# Altium PCB 8_1000M_Switch_VT1.1.PcbDoc (part 1 of 3)
Units mil, origin at the board's own origin, x right, y up, seen from the top; angles counter-clockwise.
Board outline 6257.04 x 4516.14 mil, 2 copper layers (Top Layer, Bottom Layer); 180 components, 239 nets, 766 pads, 500 vias.
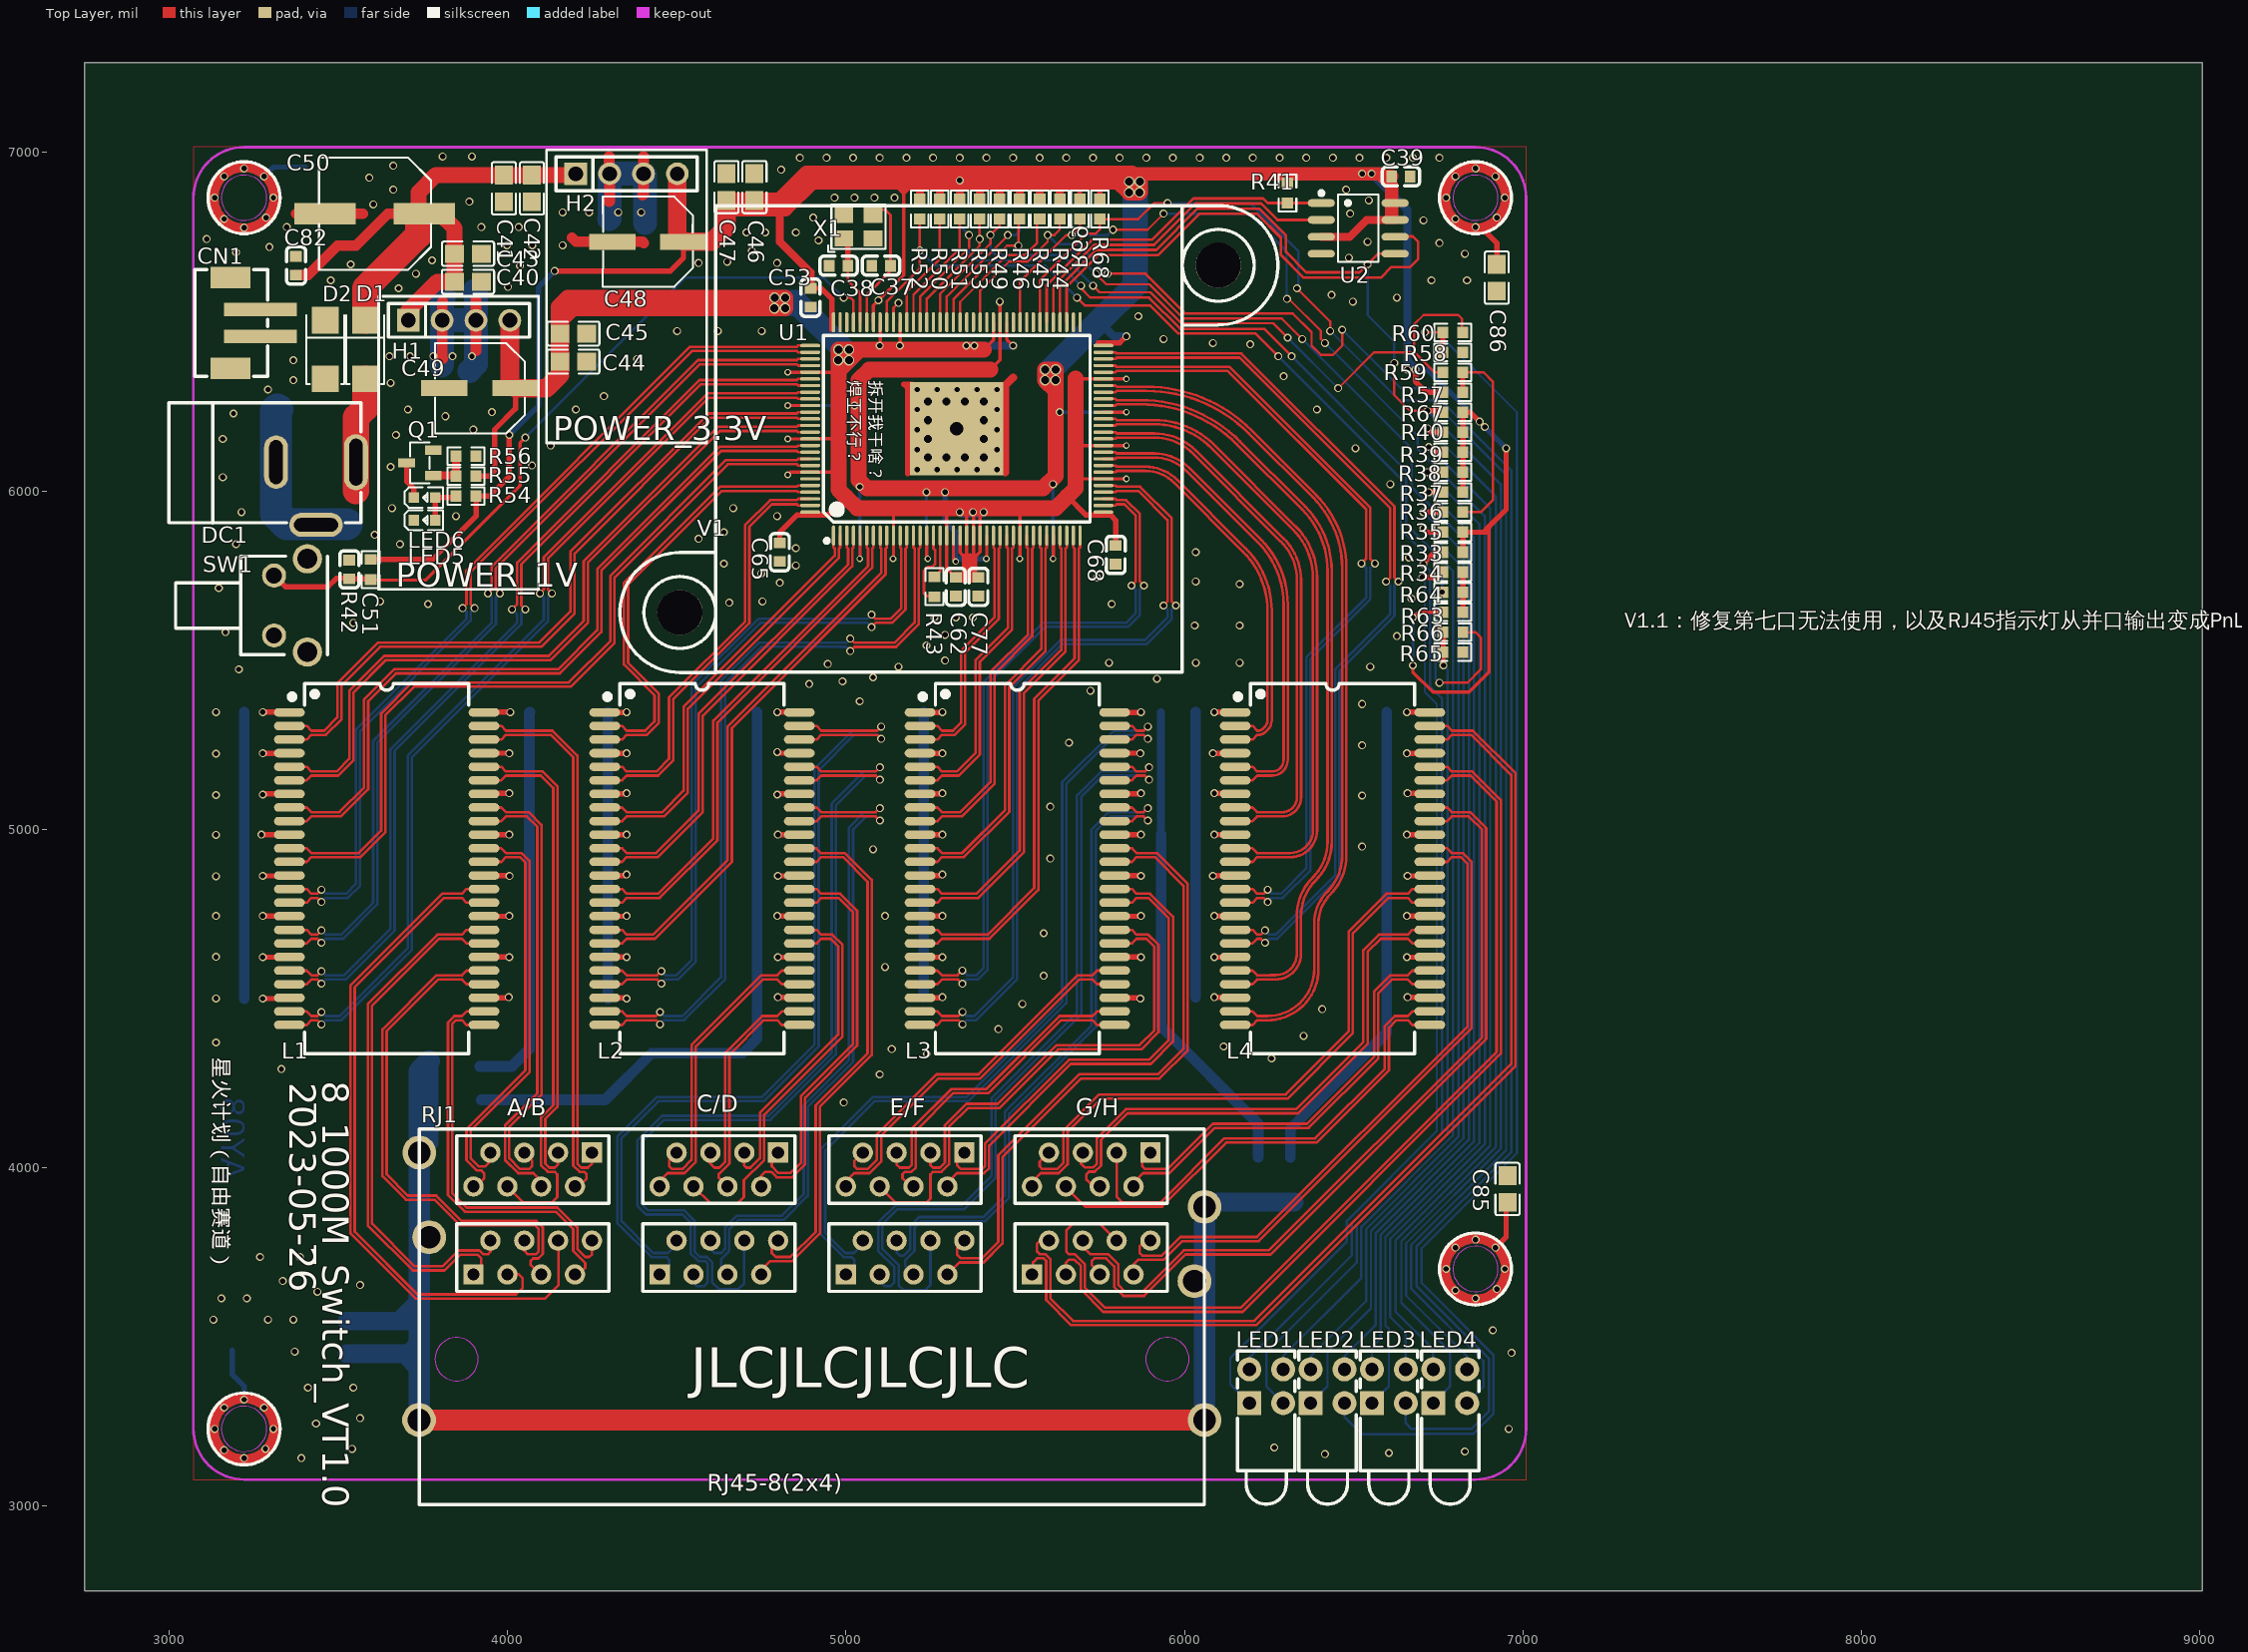
[diagram p0: Top Layer view]
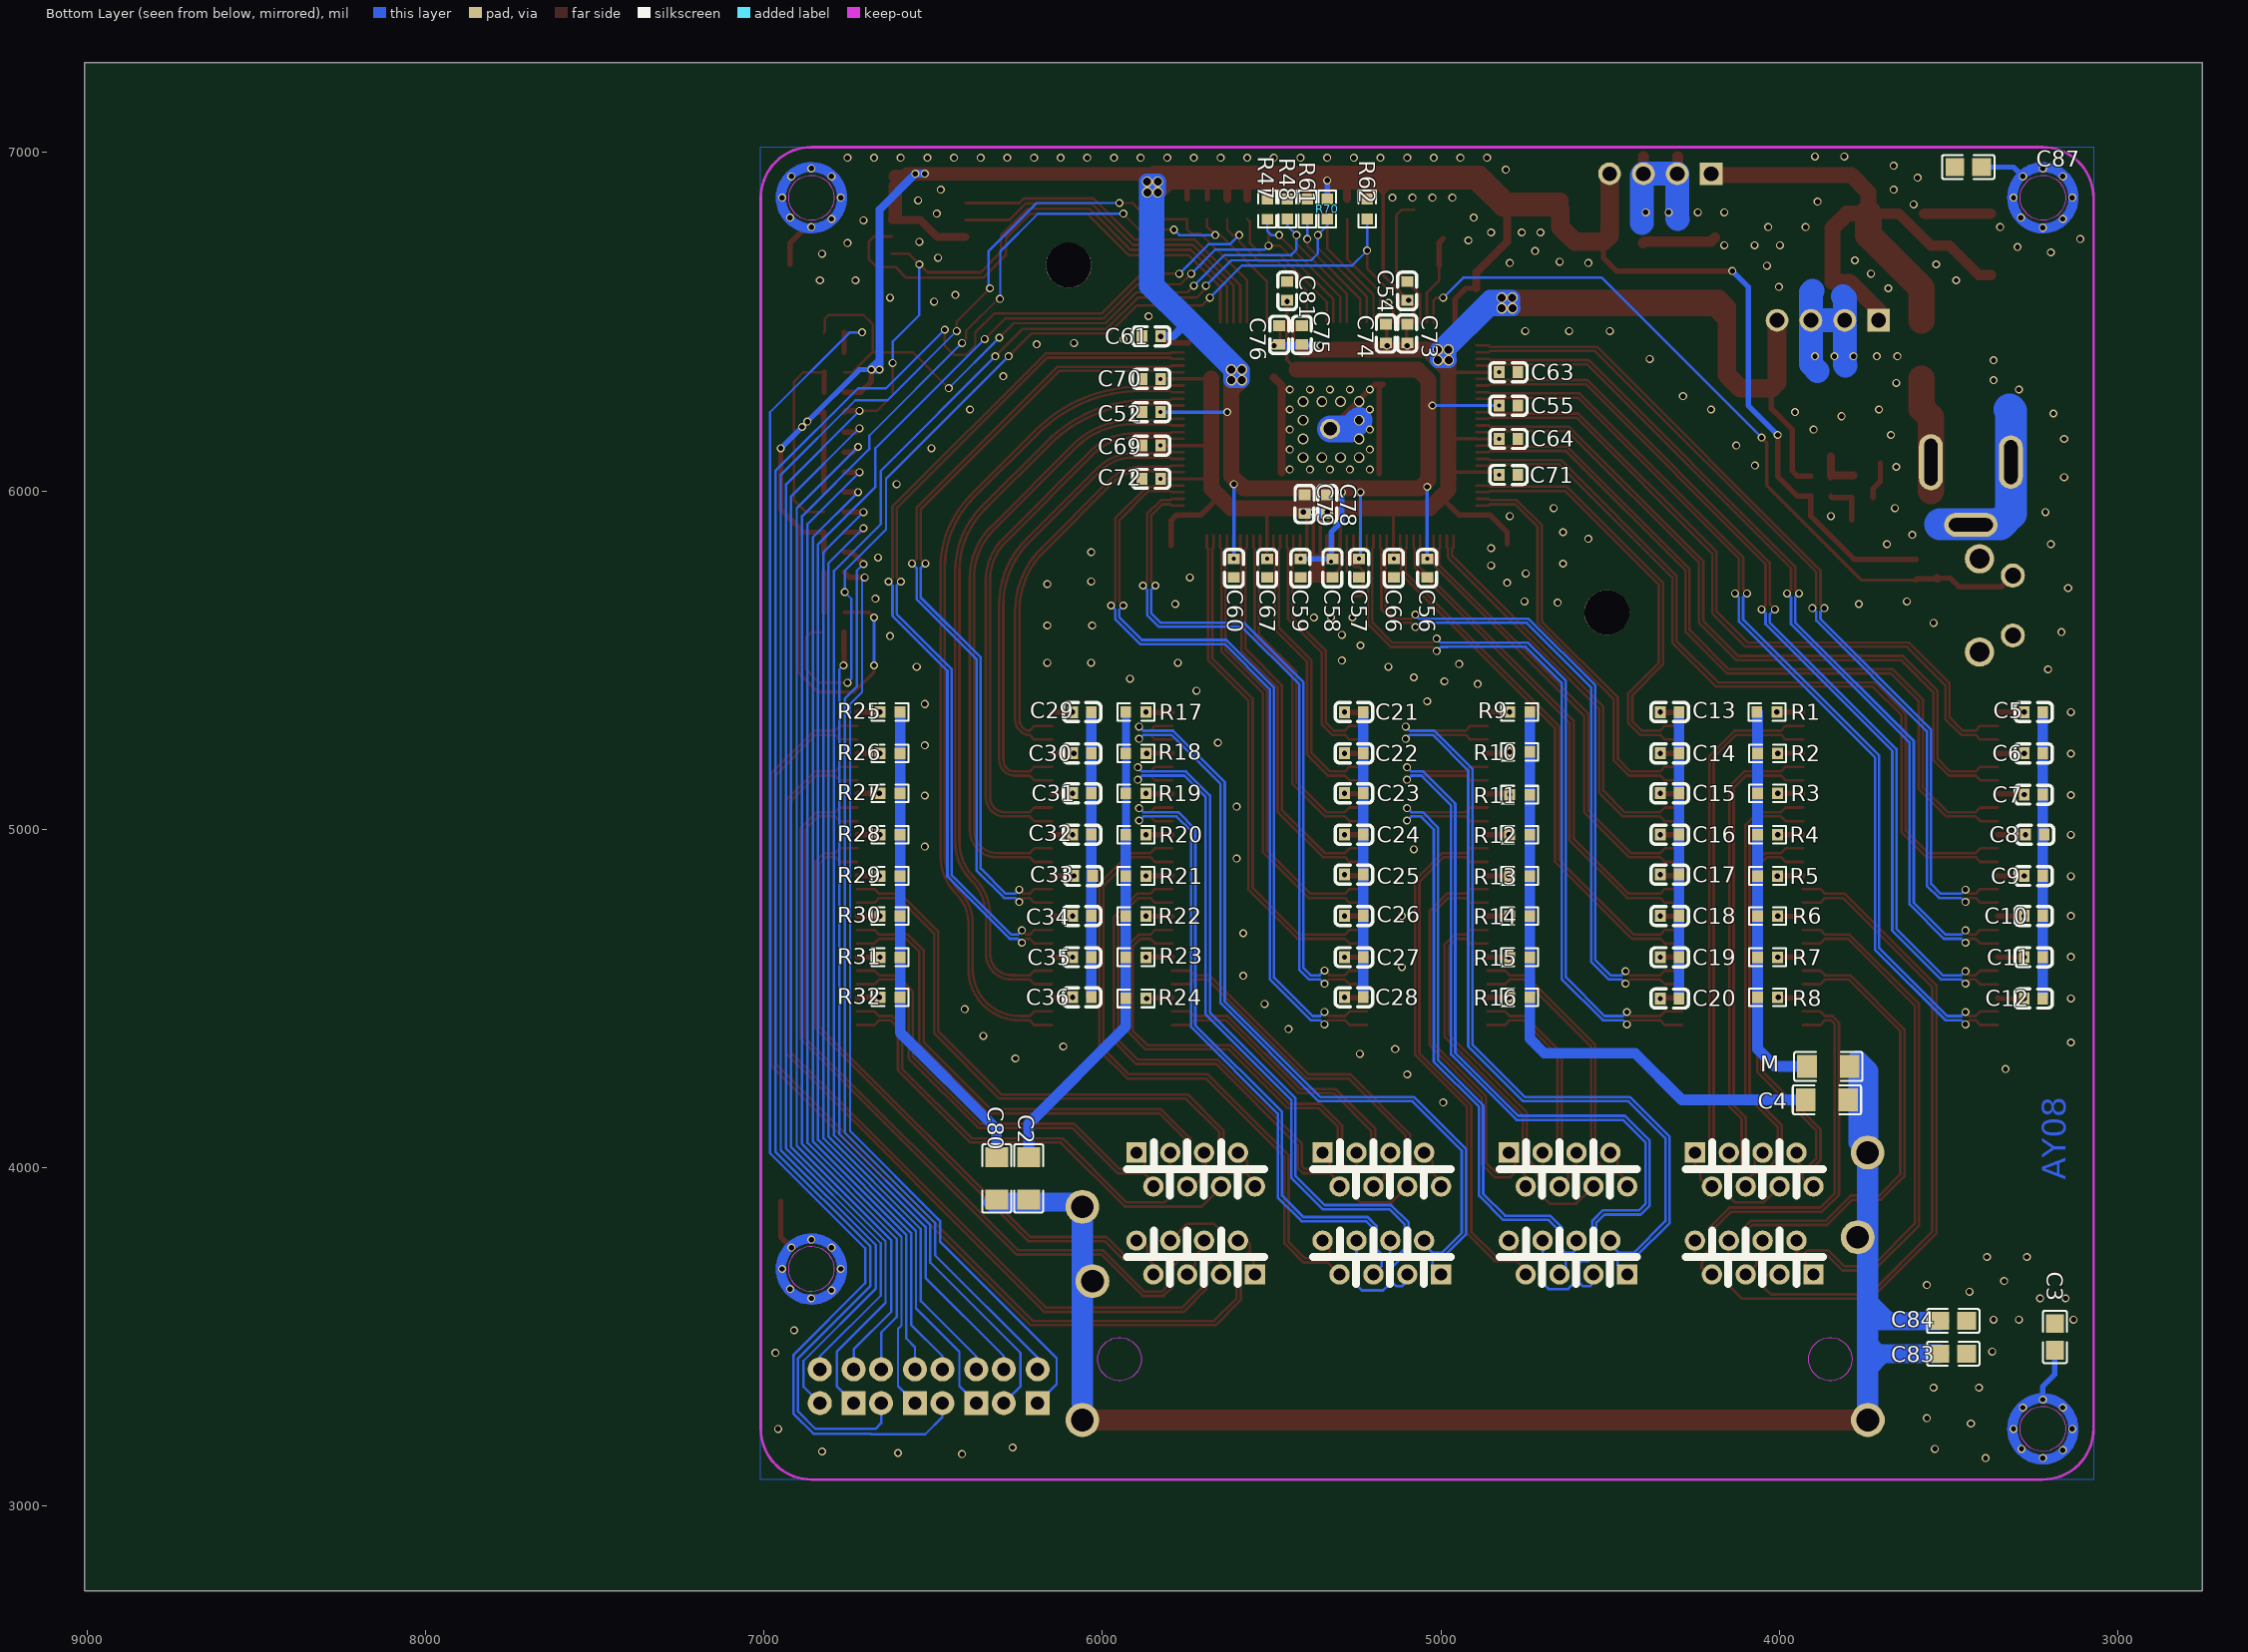
[diagram p1: Bottom Layer view, seen from below]

## Layer stack, top to bottom
Top Solder Mask Layer: solder mask 0.4, Solder Resist, Dk 3.5
Top Layer: signal copper 1.4
Dielectric1: dielectric 12.6, FR-4, Dk 4.8
Bottom Layer: signal copper 1.4
Bottom Solder Mask Layer: solder mask 0.4, Solder Resist, Dk 3.5

## Board outline
9007.04,2750 2750,2750 2750,7266.14 9007.04,7266.14

## Design rules (kind name [scope] priority, off if disabled: settings)
AssemblyTestPointUsage [All] p0: scope1count=1 scope1_0_kind=Board scope1_0_value=Board scope2count=1 scope2_0_kind=Board scope2_0_value=Board commentlength=0
AssemblyTestpoint [All] p0: scope1count=1 scope1_0_kind=Board scope1_0_value=Board scope2count=1 scope2_0_kind=Board scope2_0_value=Board commentlength=0
BoardOutlineClearance safeClearance_1 [All] p0: scope1count=1 scope1_0_kind=Board scope1_0_value=Board scope2count=1 scope2_0_kind=Board scope2_0_value=Board commentlength=0 gap=10
BoardOutlineClearance safeClearance_1 [All] p1: gap=10 ignorepadtopadclearanceinfootprint=FALSE except(0: Arc-SplitContinuation Track-SplitContinuation SMDPad-SplitContinuation THPad-SplitContinuation Via-SplitContinuation Fill-SplitContinuation Poly-SplitContinuation Region-SplitContinuation Text-SplitContinuation; 7.1: Track-OutlineEdge Track-CutoutEdge SMDPad-OutlineEdge SMDPad-CutoutEdge THPad-OutlineEdge THPad-CutoutEdge Via-OutlineEdge Via-CutoutEdge Fill-OutlineEdge Fill-CutoutEdge Poly-OutlineEdge Region-OutlineEdge Region-CutoutEdge Text-OutlineEdge)
Clearance safeClearance [All] p0 off: scope1count=1 scope1_0_kind=Board scope1_0_value=Board scope2count=1 scope2_0_kind=Board scope2_0_value=Board commentlength=4614 gap=7.1 // Protel DXP Scope 1 Expression Was: (InNet('CGND') OR InNet('P4D_P') OR InNet('P4C_N') OR InNet('P4C_P') OR InNet('P4B_N') OR InNet('P4B_P') OR InNet('P4A_N') OR InNet('P4A_P') OR InNet('P3D_N') OR InNet('P3D_P') OR InNet('P3C_N') OR InNet('P3C_P') OR InNet('P3B_N') OR InNet('P3B_P') OR InNet('P3A_P') OR InNet('P3A_N') OR InNet('P2D_N') OR InNet('P2D_P') OR InNet('P2C_N') OR InNet('P2C_P') OR InNet('P7D_N') OR InNet('P7D_P') OR InNet('P7C_N') OR InNet('P7C_P') OR InNet('P7B_N') OR InNet('P7B_P') OR InNet('P7A_N') OR InNet('P7A_P') OR InNet('P6D_N') OR InNet('P6D_P') OR InNet('P6C_N') OR InNet('P6C_P') OR InNet('P6B_N') OR InNet('P6B_P') OR InNet('P6A_N') OR InNet('P6A_P') OR InNet('P5D_N') OR InNet('P5D_P') OR InNet('P5C_N') OR InNet('P5C_P') OR InNet('P5B_N') OR InNet('P5B_P') OR InNet('P5A_N') OR InNet('P5A_P') OR InNet('P4D_N') OR InNet('P0A_P') OR InNet('P0A_N') OR InNet('P0B_P') OR InNet('P0B_N') OR InNet('P0C_P') OR InNet('P0C_N') OR InNet('P0D_P') OR InNet('P0D_N') OR InNet('P1A_P') OR InNet('P1A_N') OR InNet('P1B_P') OR InNet('P1B_N') OR InNet('P1C_N') OR InNet('P1D_P') OR InNet('P1D_N') OR InNet('P2A_P') OR InNet('P2A_N') OR InNet('P2B_P') OR InNet('P2B_N') OR InNet('P1C_P') OR InNet('R0A_N') OR InNet('R0C_P') OR InNet('R0B_N') OR InNet('R0D_N') OR InNet('R0B_P') OR InNet('R0C_N') OR InNet('R0D_P') OR InNet('R0A_P') OR InNet('R1D_P') OR InNet('R1C_N') OR InNet('R1B_P') OR InNet('R1A_P') OR InNet('R1B_N') OR InNet('R1C_P') OR InNet('R1A_N') OR InNet('R1D_N') OR InNet('R2A_N') OR InNet('R2C_P') OR InNet('R2B_N') OR InNet('R2D_N') OR InNet('R2B_P') OR InNet('R2C_N') OR InNet('R2D_P') OR InNet('R2A_P') OR InNet('R3D_P') OR InNet('R3C_N') OR InNet('R3B_P') OR InNet('R3A_P') OR InNet('R3B_N') OR InNet('R3C_P') OR InNet('R3A_N') OR InNet('R3D_N') OR InNet('R4A_N') OR InNet('R4C_P') OR InNet('R4B_N') OR InNet('R4D_N') OR InNet('R4B_P') OR InNet('R4C_N') OR InNet('R4D_P') OR InNet('R4A_P') OR InNet('R5D_P') OR InNet('R5C_N') OR InNet('R5B_P') OR InNet('R5A_P') OR InNet('R5B_N') OR InNet('R5C_P') OR InNet('R5A_N') OR InNet('R5D_N') OR InNet('GND') OR InNet('R7D_N') OR InNet('R7D_P') OR InNet('R7C_N') OR InNet('R7C_P') OR InNet('R7B_N') OR InNet('R7B_P') OR InNet('R7A_N') OR InNet('R7A_P') OR InNet('R6D_N') OR InNet('R6D_P') OR InNet('R6C_N') OR InNet('R6C_P') OR InNet('R6B_N') OR InNet('R6B_P') OR InNet('R6A_N') OR InNet('R6A_P') OR InNet('XTALO') OR InNet('XTALI') OR InNet('VIN') OR InNet('3.3V') OR InNet('1.0V') OR InNet('STRP_DIS_8051') OR InNet('STRP_EN_PWRLIGHT') OR InNet('SLED_G1A') OR InNet('SPI_F_CS') OR InNet('SPI_F_D1') OR InNet('SPI_F_CLK') OR InNet('$1N104220') OR InNet('RESET') OR InNet('LED0') OR InNet('LED4') OR InNet('LED1') OR InNet('LED5') OR InNet('LED2') OR InNet('LED6') OR InNet('LED3') OR InNet('LED7') OR InNet('$3N11849') OR InNet('$3N11850') OR InNet('$3N11851') OR InNet('$3N11852') OR InNet('$3N11853') OR InNet('$3N11854') OR InNet('$3N11855') OR InNet('$3N11856') OR InNet('$3N11722') OR InNet('$3N11721') OR InNet('$3N11720') OR InNet('$3N11719') OR InNet('$3N11718') OR InNet('$3N11717') OR InNet('$3N11844') OR InNet('$3N11843') OR InNet('$3N11857') OR InNet('$3N11858') OR InNet('$3N11859') OR InNet('$3N11860') OR InNet('$3N11861') OR InNet('$3N11862') OR InNet('$3N11863') OR InNet('$3N11864') OR InNet('$3N11730') OR InNet('$3N11729') OR InNet('$3N11728') OR InNet('$3N11727') OR InNet('$3N11726') OR InNet('$3N11725') OR InNet('$3N11724') OR InNet('$3N11723') OR InNet('$3N11865') OR InNet('$3N11866') OR InNet('$3N11867') OR InNet('$3N11868') OR InNet('$3N11869') OR InNet('$3N11870') OR InNet('$3N11871') OR InNet('$3N11872') OR InNet('$3N11738') OR InNet('$3N11737') OR InNet('$3N11736') OR InNet('$3N11735') OR InNet('$3N11734') OR InNet('$3N11733') OR InNet('$3N11732') OR InNet('$3N11731') OR InNet('$3N11873') OR InNet('$3N11874') OR InNet('$3N11875') OR InNet('$3N11876') OR InNet('$3N11877') OR InNet('$3N11878') OR InNet('$3N11879') OR InNet('$3N11880') OR InNet('$3N11746') OR InNet('$3N11745') OR InNet('$3N11744') OR InNet('$3N11743') OR InNet('$3N11742') OR InNet('$3N11741') OR InNet('$3N11740') OR InNet('$3N11739') OR InNet('$3N11846') OR InNet('$3N11884') OR InNet('$3N11848') OR InNet('$3N11885') OR InNet('$4N785') OR InNet('PGND') OR InNet('$4N2979') OR InNet('$4N2951') OR InNet('$4N2923') OR InNet('P0LED0') OR InNet('P1LED0') OR InNet('STRP_SMI_SEL1') OR InNet('P2LED0') OR InNet('P3LED0') OR InNet('P4LED0') OR InNet('P5LED0') OR InNet('P6LED0') OR InNet('P7LED0') OR InNet('STRP_EN_PHY') OR InNet('STRP_EN_EEE') OR InNet('$1N185939') OR InNet('$1N185642') OR InNet('$1N185934') OR InNet('$1N185587'))
Clearance safeClearance [(InNet('CGND') OR InNet('P4D_P') OR InNet('P4C_N') OR InNet('P4C_P') OR InNet('P4B_N') OR InNet('P4B_P') OR InNet('P4A_N') OR InNet('P4A_P') OR InNet('P3D_N') OR InNet('P3D_P') OR InNet('P3C_N') OR InNet('P3C_P') OR InNet('P3B_N') OR InNet('P3B_P') OR InNet('P3A_P') OR InNet('P3A_N') OR InNet('P2D_N') OR InNet('P2D_P') OR InNet('P2C_N') OR InNet('P2C_P') OR InNet('P7D_N') OR InNet('P7D_P') OR InNet('P7C_N') OR InNet('P7C_P') OR InNet('P7B_N') OR InNet('P7B_P') OR InNet('P7A_N') OR InNet('P7A_P') OR InNet('P6D_N') OR InNet('P6D_P') OR InNet('P6C_N') OR InNet('P6C_P') OR InNet('P6B_N') OR InNet('P6B_P') OR InNet('P6A_N') OR InNet('P6A_P') OR InNet('P5D_N') OR InNet('P5D_P') OR InNet('P5C_N') OR InNet('P5C_P') OR InNet('P5B_N') OR InNet('P5B_P') OR InNet('P5A_N') OR InNet('P5A_P') OR InNet('P4D_N') OR InNet('P0A_P') OR InNet('P0A_N') OR InNet('P0B_P') OR InNet('P0B_N') OR InNet('P0C_P') OR InNet('P0C_N') OR InNet('P0D_P') OR InNet('P0D_N') OR InNet('P1A_P') OR InNet('P1A_N') OR InNet('P1B_P') OR InNet('P1B_N') OR InNet('P1C_N') OR InNet('P1D_P') OR InNet('P1D_N') OR InNet('P2A_P') OR InNet('P2A_N') OR InNet('P2B_P') OR InNet('P2B_N') OR InNet('P1C_P') OR InNet('R0A_N') OR InNet('R0C_P') OR InNet('R0B_N') OR InNet('R0D_N') OR InNet('R0B_P') OR InNet('R0C_N') OR InNet('R0D_P') OR InNet('R0A_P') OR InNet('R1D_P') OR InNet('R1C_N') OR InNet('R1B_P') OR InNet('R1A_P') OR InNet('R1B_N') OR InNet('R1C_P') OR InNet('R1A_N') OR InNet('R1D_N') OR InNet('R2A_N') OR InNet('R2C_P') OR InNet('R2B_N') OR InNet('R2D_N') OR InNet('R2B_P') OR InNet('R2C_N') OR InNet('R2D_P') OR InNet('R2A_P') OR InNet('R3D_P') OR InNet('R3C_N') OR InNet('R3B_P') OR InNet('R3A_P') OR InNet('R3B_N') OR InNet('R3C_P') OR InNet('R3A_N') OR InNet('R3D_N') OR InNet('R4A_N') OR InNet('R4C_P') OR InNet('R4B_N') OR InNet('R4D_N') OR InNet('R4B_P') OR InNet('R4C_N') OR InNet('R4D_P') OR InNet('R4A_P') OR InNet('R5D_P') OR InNet('R5C_N') OR InNet('R5B_P') OR InNet('R5A_P') OR InNet('R5B_N') OR InNet('R5C_P') OR InNet('R5A_N') OR InNet('R5D_N') OR InNet('GND') OR InNet('R7D_N') OR InNet('R7D_P') OR InNet('R7C_N') OR InNet('R7C_P') OR InNet('R7B_N') OR InNet('R7B_P') OR InNet('R7A_N') OR InNet('R7A_P') OR InNet('R6D_N') OR InNet('R6D_P') OR InNet('R6C_N') OR InNet('R6C_P') OR InNet('R6B_N') OR InNet('R6B_P') OR InNet('R6A_N') OR InNet('R6A_P') OR InNet('XTALO') OR InNet('XTALI') OR InNet('VIN') OR InNet('3.3V') OR InNet('1.0V') OR InNet('STRP_DIS_8051') OR InNet('STRP_EN_PWRLIGHT') OR InNet('SLED_G1A') OR InNet('SPI_F_CS') OR InNet('SPI_F_D1') OR InNet('SPI_F_CLK') OR InNet('$1N104220') OR InNet('RESET') OR InNet('LED0') OR InNet('LED4') OR InNet('LED1') OR InNet('LED5') OR InNet('LED2') OR InNet('LED6') OR InNet('LED3') OR InNet('LED7') OR InNet('$3N11849') OR InNet('$3N11850') OR InNet('$3N11851') OR InNet('$3N11852') OR InNet('$3N11853') OR InNet('$3N11854') OR InNet('$3N11855') OR InNet('$3N11856') OR InNet('$3N11722') OR InNet('$3N11721') OR InNet('$3N11720') OR InNet('$3N11719') OR InNet('$3N11718') OR InNet('$3N11717') OR InNet('$3N11844') OR InNet('$3N11843') OR InNet('$3N11857') OR InNet('$3N11858') OR InNet('$3N11859') OR InNet('$3N11860') OR InNet('$3N11861') OR InNet('$3N11862') OR InNet('$3N11863') OR InNet('$3N11864') OR InNet('$3N11730') OR InNet('$3N11729') OR InNet('$3N11728') OR InNet('$3N11727') OR InNet('$3N11726') OR InNet('$3N11725') OR InNet('$3N11724') OR InNet('$3N11723') OR InNet('$3N11865') OR InNet('$3N11866') OR InNet('$3N11867') OR InNet('$3N11868') OR InNet('$3N11869') OR InNet('$3N11870') OR InNet('$3N11871') OR InNet('$3N11872') OR InNet('$3N11738') OR InNet('$3N11737') OR InNet('$3N11736') OR InNet('$3N11735') OR InNet('$3N11734') OR InNet('$3N11733') OR InNet('$3N11732') OR InNet('$3N11731') OR InNet('$3N11873') OR InNet('$3N11874') OR InNet('$3N11875') OR InNet('$3N11876') OR InNet('$3N11877') OR InNet('$3N11878') OR InNet('$3N11879') OR InNet('$3N11880') OR InNet('$3N11746') OR InNet('$3N11745') OR InNet('$3N11744') OR InNet('$3N11743') OR InNet('$3N11742') OR InNet('$3N11741') OR InNet('$3N11740') OR InNet('$3N11739') OR InNet('$3N11846') OR InNet('$3N11884') OR InNet('$3N11848') OR InNet('$3N11885') OR InNet('$4N785') OR InNet('PGND') OR InNet('$4N2979') OR InNet('$4N2951') OR InNet('$4N2923') OR InNet('P0LED0') OR InNet('P1LED0') OR InNet('STRP_SMI_SEL1') OR InNet('P2LED0') OR InNet('P3LED0') OR InNet('P4LED0') OR InNet('P5LED0') OR InNet('P6LED0') OR InNet('P7LED0') OR InNet('STRP_EN_PHY') OR InNet('STRP_EN_EEE') OR InNet('$1N185939') OR InNet('$1N185642') OR InNet('$1N185934') OR InNet('$1N185587'))] p1: gap=7.1 ignorepadtopadclearanceinfootprint=FALSE except(7: Arc-Arc Arc-Track Arc-SMDPad Arc-THPad Arc-Via Arc-Fill Arc-Poly Arc-Region Arc-Text Arc-Hole)
ComponentClearance [All] p0: scope1count=1 scope1_0_kind=Board scope1_0_value=Board scope2count=1 scope2_0_kind=Board scope2_0_value=Board commentlength=0 gap=10 collisioncheckmode=3
DiffPairsRouting differentialPair [All] p0: scope1count=1 scope1_0_kind=Board scope1_0_value=Board scope2count=1 scope2_0_kind=Board scope2_0_value=Board commentlength=0
DiffPairsRouting differentialPair [All] p1: maxlimit=4.53 minlimit=4.53 mostfreqgap=4.53 toplayer_minwidth=7.76 toplayer_maxwidth=7.76 toplayer_prefwidth=7.76 bottomlayer_minwidth=7.76 bottomlayer_maxwidth=7.76 bottomlayer_prefwidth=7.76 maxuncoupledlength=393.7
FabricationTestPointUsage [All] p0: scope1count=1 scope1_0_kind=Board scope1_0_value=Board scope2count=1 scope2_0_kind=Board scope2_0_value=Board commentlength=0 valid=0 allowmultiple=FALSE
FabricationTestpoint [All] p0: scope1count=1 scope1_0_kind=Board scope1_0_value=Board scope2count=1 scope2_0_kind=Board scope2_0_value=Board commentlength=0 side=3 testpointundercomponent=TRUE minsize=40 maxsize=100 preferedsize=60 minholesize=0 maxholesize=40 preferedholesize=32 testpointgrid=1
FanoutControl Fanout_BGA [All] p0 off: scope1count=1 scope1_0_kind=Board scope1_0_value=Board scope2count=1 scope2_0_kind=Board scope2_0_value=Board commentlength=69 // Protel DXP Scope 1 Expression Was: IsBGA   Fanout_BGA (Default Rule)
FanoutControl Fanout_LCC [All] p0 off: scope1count=1 scope1_0_kind=Board scope1_0_value=Board scope2count=1 scope2_0_kind=Board scope2_0_value=Board commentlength=69 // Protel DXP Scope 1 Expression Was: IsLCC   Fanout_LCC (Default Rule)
FanoutControl Fanout_SOIC [All] p0 off: scope1count=1 scope1_0_kind=Board scope1_0_value=Board scope2count=1 scope2_0_kind=Board scope2_0_value=Board commentlength=71 // Protel DXP Scope 1 Expression Was: IsSOIC   Fanout_SOIC (Default Rule)
FanoutControl Fanout_Small [All] p0 off: scope1count=1 scope1_0_kind=Board scope1_0_value=Board scope2count=1 scope2_0_kind=Board scope2_0_value=Board commentlength=84 // Protel DXP Scope 1 Expression Was: (CompPinCount < 5)   Fanout_Small (Default Rule)
FanoutControl Fanout_Default [All] p0: scope1count=1 scope1_0_kind=Board scope1_0_value=Board scope2count=1 scope2_0_kind=Board scope2_0_value=Board commentlength=30 // Fanout_Default (Default Rule)
Height [All] p0: scope1count=1 scope1_0_kind=Board scope1_0_value=Board scope2count=1 scope2_0_kind=Board scope2_0_value=Board commentlength=0
HoleSize [All] p0: scope1count=1 scope1_0_kind=Board scope1_0_value=Board scope2count=1 scope2_0_kind=Board scope2_0_value=Board commentlength=0 absolutevalues=TRUE maxlimit=100 minlimit=1 maxpercent=80.000 minpercent=20.000
HoleToHoleClearance [All] p0: scope1count=1 scope1_0_kind=Board scope1_0_value=Board scope2count=1 scope2_0_kind=Board scope2_0_value=Board commentlength=0
LayerPairs [All] p0: scope1count=1 scope1_0_kind=Board scope1_0_value=Board scope2count=1 scope2_0_kind=Board scope2_0_value=Board commentlength=0 enforce=TRUE
MinimumSolderMaskSliver [All] p0: scope1count=1 scope1_0_kind=Board scope1_0_value=Board scope2count=1 scope2_0_kind=Board scope2_0_value=Board commentlength=0
NetAntennae [All] p0: scope1count=1 scope1_0_kind=Board scope1_0_value=Board scope2count=1 scope2_0_kind=Board scope2_0_value=Board commentlength=0
PasteMaskExpansion pasteMaskExpansion [All] p0: scope1count=1 scope1_0_kind=Board scope1_0_value=Board scope2count=1 scope2_0_kind=Board scope2_0_value=Board commentlength=0 expansion=0
PasteMaskExpansion pasteMaskExpansion [All] p1: expansion=0
PlaneClearance [All] p0: scope1count=1 scope1_0_kind=Board scope1_0_value=Board scope2count=1 scope2_0_kind=Board scope2_0_value=Board commentlength=0 clearance=20
PlaneConnect innerPlane [All] p0: scope1count=1 scope1_0_kind=Board scope1_0_value=Board scope2count=1 scope2_0_kind=Board scope2_0_value=Board commentlength=0 planeconnectstyle=Relief reliefexpansion=20 reliefentries=4 reliefconductorwidth=10 reliefairgap=10
PlaneConnect innerPlane [All] p1: planeconnectstyle=Relief reliefexpansion=20 reliefentries=4 reliefconductorwidth=10 reliefairgap=10
PolygonConnect copperRegion [All] p0: scope1count=1 scope1_0_kind=Board scope1_0_value=Board scope2count=1 scope2_0_kind=Board scope2_0_value=Board commentlength=0 connectstyle=Relief reliefconductorwidth=19.68 reliefentries=4 polygonreliefangle="90 Angle"
PolygonConnect CGND [All] p0: scope1count=1 scope1_0_kind=Board scope1_0_value=Board scope2count=1 scope2_0_kind=Board scope2_0_value=Board commentlength=0 connectstyle=Relief reliefconductorwidth=10 reliefentries=4 polygonreliefangle="90 Angle"
PolygonConnect copperRegion [All] p1: connectstyle=Relief reliefconductorwidth=19.68 reliefentries=4 polygonreliefangle="90 Angle" airgapwidth=9.84
PolygonConnect CGND [All] p2: connectstyle=Relief reliefconductorwidth=10 reliefentries=4 polygonreliefangle="90 Angle" airgapwidth=10
RoutingCorners [All] p0: scope1count=1 scope1_0_kind=Board scope1_0_value=Board scope2count=1 scope2_0_kind=Board scope2_0_value=Board commentlength=0 cornerstyle=45-Degree minsetback=100 maxsetback=100
RoutingLayers [All] p0: scope1count=1 scope1_0_kind=Board scope1_0_value=Board scope2count=1 scope2_0_kind=Board scope2_0_value=Board commentlength=0 top layer=Automatic bottom layer=Automatic
RoutingPriority [All] p0: scope1count=1 scope1_0_kind=Board scope1_0_value=Board scope2count=1 scope2_0_kind=Board scope2_0_value=Board commentlength=0
RoutingTopology [All] p0: scope1count=1 scope1_0_kind=Board scope1_0_value=Board scope2count=1 scope2_0_kind=Board scope2_0_value=Board commentlength=0 topology=Shortest
RoutingVias viaSize [All] p0: scope1count=1 scope1_0_kind=Board scope1_0_value=Board scope2count=1 scope2_0_kind=Board scope2_0_value=Board commentlength=0 holewidth=15.75 width=23.62 viastyle="Through Hole" minholewidth=11.81 minwidth=19.68 maxholewidth=236.22 maxwidth=393.7
RoutingVias viaSize [All] p1: holewidth=15.75 width=23.62 viastyle="Through Hole" minholewidth=11.81 minwidth=19.68 maxholewidth=236.22 maxwidth=393.7
ShortCircuit [All] p0: scope1count=1 scope1_0_kind=Board scope1_0_value=Board scope2count=1 scope2_0_kind=Board scope2_0_value=Board commentlength=0 allowed=FALSE
SilkToBoardRegionClearance [All] p0: scope1count=1 scope1_0_kind=Board scope1_0_value=Board scope2count=1 scope2_0_kind=Board scope2_0_value=Board commentlength=0
SilkToSilkClearance [All] p0: scope1count=1 scope1_0_kind=Board scope1_0_value=Board scope2count=1 scope2_0_kind=Board scope2_0_value=Board commentlength=0
SilkToSolderMaskClearance [All] p0 off: scope1count=1 scope1_0_kind=Board scope1_0_value=Board scope2count=1 scope2_0_kind=Board scope2_0_value=Board commentlength=44 // Protel DXP Scope 1 Expression Was: IsPad
SolderMaskExpansion solderMaskExpansion [All] p0: scope1count=1 scope1_0_kind=Board scope1_0_value=Board scope2count=1 scope2_0_kind=Board scope2_0_value=Board commentlength=0 expansion=2.01
SolderMaskExpansion solderMaskExpansion [All] p1: expansion=2.01 istentingtop=FALSE useseparateexpansions=TRUE expansionbottom=2.01 istentingbottom=FALSE
UnRoutedNet [All] p0: scope1count=1 scope1_0_kind=Board scope1_0_value=Board scope2count=1 scope2_0_kind=Board scope2_0_value=Board commentlength=0
UnpouredPolygon [All] p0: scope1count=1 scope1_0_kind=Board scope1_0_value=Board scope2count=1 scope2_0_kind=Board scope2_0_value=Board commentlength=0
Width trackWidth [All] p0: scope1count=1 scope1_0_kind=Board scope1_0_value=Board scope2count=1 scope2_0_kind=Board scope2_0_value=Board commentlength=0 maxlimit=394 minlimit=7 preferedwidth=7
Width trackWidth1 [All] p0: scope1count=1 scope1_0_kind=Board scope1_0_value=Board scope2count=1 scope2_0_kind=Board scope2_0_value=Board commentlength=0 maxlimit=79 minlimit=8 preferedwidth=10
Width trackWidth [All] p1: maxlimit=394 minlimit=7 preferedwidth=7
Width trackWidth1 [All] p2: maxlimit=79 minlimit=8 preferedwidth=10
27 further rules are at their usual default settings.

## Components (designator, comment, footprint, x,y, rotation, side; value= is the part's Value field where it differs from the comment)
C2 "102R18W102KV4E" C1206 6217.67,3968.61 r270 bottom
C3 "CAP_0805" C0805 3186.17,3500.39 r270 bottom
C4 "102R18W102KV4E" C1206 3859.4,4201.18 r0 bottom
C5 "CAP_0603" C0603 3249.16,5346.85 r0 bottom
C6 "CAP_0603" C0603 3249.16,5224.8 r0 bottom
C7 "CAP_0603" C0603 3249.16,5102.76 r0 bottom
C8 "CAP_0603" C0603 3245.22,4984.65 r0 bottom
C9 "CAP_0603" C0603 3249.16,4862.6 r0 bottom
C10 "CAP_0603" C0603 3249.16,4744.49 r0 bottom
C11 "CAP_0603" C0603 3249.16,4622.44 r0 bottom
C12 "CAP_0603" C0603 3249.16,4500.39 r0 bottom
C13 "CAP_0603" C0603 4323.96,5346.85 r0 bottom
C14 "CAP_0603" C0603 4323.96,5224.8 r0 bottom
C15 "CAP_0603" C0603 4323.96,5106.69 r0 bottom
C16 "CAP_0603" C0603 4323.96,4984.65 r0 bottom
C17 "CAP_0603" C0603 4323.96,4866.54 r0 bottom
C18 "CAP_0603" C0603 4323.96,4744.49 r0 bottom
C19 "CAP_0603" C0603 4323.96,4622.44 r0 bottom
C20 "CAP_0603" C0603 4323.96,4500.39 r0 bottom
C21 "CAP_0603" C0603 5257.03,5346.85 r0 bottom
C22 "CAP_0603" C0603 5257.03,5224.8 r0 bottom
C23 "CAP_0603" C0603 5257.03,5106.69 r0 bottom
C24 "CAP_0603" C0603 5257.03,4984.65 r0 bottom
C25 "CAP_0603" C0603 5257.03,4866.54 r0 bottom
C26 "CAP_0603" C0603 5257.03,4744.49 r0 bottom
C27 "CAP_0603" C0603 5257.03,4622.44 r0 bottom
C28 "CAP_0603" C0603 5257.03,4504.33 r0 bottom
C29 "CAP_0603" C0603 6060.19,5346.85 r0 bottom
C30 "CAP_0603" C0603 6060.19,5224.8 r0 bottom
C31 "CAP_0603" C0603 6060.19,5106.69 r0 bottom
C32 "CAP_0603" C0603 6060.19,4984.65 r0 bottom
C33 "CAP_0603" C0603 6056.25,4862.6 r0 bottom
C34 "CAP_0603" C0603 6060.19,4744.49 r0 bottom
C35 "CAP_0603" C0603 6060.19,4622.44 r0 bottom
C36 "CAP_0603" C0603 6060.19,4504.33 r0 bottom
C37 "CAP_0603" C0603 5103.49,6665.75 r0 top
C38 "CAP_0603" C0603 4977.51,6665.75 r180 top
C39 "CAP_0603" C0603 6638.93,6929.53 r180 top
C40 "CAP_0805" C0805 3883.02,6618.51 r180 top
C41 "CAP_0805" C0805 3989.32,6894.1 r90 top
C42 "CAP_0805" C0805 4072,6894.1 r90 top
C43 "CAP_0805" C0805 3883.02,6701.18 r180 top
C44 "CAP_0805" C0805 4194.04,6382.28 r180 top
C45 "CAP_0805" C0805 4194.04,6464.96 r180 top
C46 "CAP_0805" C0805 4729.48,6898.03 r270 top
C47 "CAP_0805" C0805 4646.8,6898.03 r270 top
C48 "VSS470M1CTR-0604" CAP-SMD_BD6.3-L6.6-W6.6-FD 4414.52,6736.62 r180 top
C49 "VSS470M1CTR-0604" CAP-SMD_BD6.3-L6.6-W6.6-FD 3918.45,6303.54 r180 top
C50 "RVT220UF35V67RV0024" CAP-SMD_BD8.0-L8.3-W8.3-LS9.3-FD 3607.43,6819.29 r180 top
C51 "CAP_0603" C0603 3532.63,5768.11 r270 top
C52 "CAP_0603" C0603 5855.46,6232.68 r180 bottom
C53 "CAP_0603" C0603 4894.83,6571.26 r90 top
C54 "CAP_0603" C0603 5099.56,6590.95 r270 bottom
C55 "CAP_0603" C0603 4800.34,6252.36 r0 bottom
C56 "CAP_0603" C0603 5040.5,5772.05 r90 bottom
C57 "CAP_0603" C0603 5241.29,5772.05 r90 bottom
C58 "CAP_0603" C0603 5320.03,5772.05 r90 bottom
C59 "CAP_0603" C0603 5414.52,5772.05 r90 bottom
C60 "CAP_0603" C0603 5611.37,5772.05 r90 bottom
C61 "CAP_0603" C0603 5855.46,6457.09 r180 bottom
C62 "CAP_0603" C0603 5323.96,5716.93 r90 top
C63 "CAP_0603" C0603 4800.34,6350.79 r0 bottom
C64 "CAP_0603" C0603 4800.34,6153.94 r0 bottom
C65 "CAP_0603" C0603 4804.28,5819.29 r90 top
C66 "CAP_0603" C0603 5138.93,5772.05 r90 bottom
C67 "CAP_0603" C0603 5512.94,5772.05 r90 bottom
C68 "CAP_0603" C0603 5796.41,5811.42 r90 top
C69 "CAP_0603" C0603 5855.46,6134.25 r180 bottom
C70 "CAP_0603" C0603 5855.46,6331.1 r180 bottom
C71 "CAP_0603" C0603 4800.34,6047.64 r0 bottom
C72 "CAP_0603" C0603 5855.46,6035.83 r180 bottom
C73 "CAP_0603" C0603 5099.56,6464.96 r270 bottom
C74 "CAP_0603" C0603 5162.55,6464.96 r270 bottom
C75 "CAP_0603" C0603 5410.58,6461.03 r270 bottom
C76 "CAP_0603" C0603 5477.51,6461.03 r270 bottom
C77 "CAP_0603" C0603 5390.89,5716.93 r90 top
C78 "CAP_0603" C0603 5335.78,5961.02 r270 bottom
C79 "CAP_0603" C0603 5402.7,5961.02 r270 bottom
C80 "102R18W102KV4E" C1206 6312.15,3968.61 r90 bottom
C81 "CAP_0603" C0603 5453.89,6590.95 r270 bottom
C82 "CAP_0603" C0603 3375.14,6665.75 r270 top
C83 "CAP_0805" C0805 3486.31,3450.96 r0 bottom
C84 "CAP_0805" C0805 3486.31,3547.8 r0 bottom
C85 "CAP_0805" C0805 6953.89,3937.4 r270 top
C86 "CAP_0805" C0805 6922.39,6630.32 r90 top
C87 "CAP_0805" C0805 3442.07,6957.09 r180 bottom
CN1 "X2016WVS-02-9TSW" CONN-SMD_P2.00_X2016WVS-02-9TSW 3225.54,6496.46 r270 top
D1 "SS34_C8678" SMA_L4.3-W2.6-LS5.2-RD 3579.87,6417.72 r270 top
D2 "SS34_C8678" SMA_L4.3-W2.6-LS5.2-RD 3461.76,6417.72 r270 top
DC1 "DC-005-5A-2.5" DC-IN-TH_DC-005-5A-2.5 3434.2,5992.52 r0 top
H1 "2.54-1*4P母" HDR-TH_4P-P2.54-V-F 3856.64,6504.33 r0 top locked
H2 "2.54-1*4P母" HDR-TH_4P-P2.54-V-F 4351.52,6937.4 r0 top locked
L1 "G4801S_C408893" SMD-48_L27.8-W12.3-P1.02-LS15.3-BL 3642.86,4884.03 r270 top locked
L2 "G4801S_C408893" SMD-48_L27.8-W12.3-P1.02-LS15.3-BL 4574.43,4884.03 r270 top locked
L3 "G4801S_C408893" SMD-48_L27.8-W12.3-P1.02-LS15.3-BL 5505.89,4884.03 r270 top locked
L4 "G4801S_C408893" SMD-48_L27.8-W12.3-P1.02-LS15.3-BL 6437,4884.03 r270 top locked
LED1 "LH32K039F" LED-TH_A694B2SYGS530-E2 6241.29,3354.72 r0 top
LED2 "LH32K039F" LED-TH_A694B2SYGS530-E2 6422.39,3354.72 r0 top
LED3 "LH32K039F" LED-TH_A694B2SYGS530-E2 6603.49,3354.72 r0 top
LED4 "LH32K039F" LED-TH_A694B2SYGS530-E2 6784.6,3354.72 r0 top
LED5 "LED_0603-R" LED_0603 3757.03,5913.78 r0 top
LED6 "LED_0603-R" LED_0603 3757.03,5980.71 r0 top
M "102R18W102KV4E" C1206 3855.17,4299.61 r180 bottom
Q1 "AO3400A_N" SOT-23-3_L2.9-W1.3-P1.90-LS2.4-BR 3741.29,6083.07 r0 top
R1 "Res_0603" R0603 4036.56,5346.85 r0 bottom
R2 "Res_0603" R0603 4034.73,5224.8 r0 bottom
R3 "Res_0603" R0603 4034.73,5106.69 r0 bottom
R4 "Res_0603" R0603 4034.73,4984.65 r0 bottom
R5 "Res_0603" R0603 4034.73,4862.6 r0 bottom
R6 "Res_0603" R0603 4034.73,4744.49 r0 bottom
R7 "Res_0603" R0603 4034.73,4622.44 r0 bottom
R8 "Res_0603" R0603 4034.73,4504.33 r0 bottom
R9 "Res_0603" R0603 4767.01,5346.85 r180 bottom
R10 "Res_0603" R0603 4767.01,5228.74 r180 bottom
R11 "Res_0603" R0603 4767.01,5102.76 r180 bottom
R12 "Res_0603" R0603 4767.01,4984.65 r180 bottom
R13 "Res_0603" R0603 4767.01,4862.6 r180 bottom
R14 "Res_0603" R0603 4767.01,4744.49 r180 bottom
R15 "Res_0603" R0603 4767.01,4622.44 r180 bottom
R16 "Res_0603" R0603 4767.01,4504.33 r180 bottom
R17 "Res_0603" R0603 5900.87,5346.85 r0 bottom
R18 "Res_0603" R0603 5900.87,5224.8 r0 bottom
R19 "Res_0603" R0603 5900.87,5106.69 r0 bottom
R20 "Res_0603" R0603 5900.87,4984.65 r0 bottom
R21 "Res_0603" R0603 5900.87,4862.6 r0 bottom
R22 "Res_0603" R0603 5900.87,4744.49 r0 bottom
R23 "Res_0603" R0603 5900.87,4622.44 r0 bottom
R24 "Res_0603" R0603 5900.87,4500.39 r0 bottom
R25 "Res_0603" R0603 6627.12,5346.85 r180 bottom
R26 "Res_0603" R0603 6627.12,5224.8 r180 bottom
R27 "Res_0603" R0603 6627.12,5106.69 r180 bottom
R28 "Res_0603" R0603 6627.12,4984.65 r180 bottom
R29 "Res_0603" R0603 6627.12,4862.6 r180 bottom
R30 "Res_0603" R0603 6627.12,4744.49 r180 bottom
R31 "Res_0603" R0603 6627.12,4622.44 r180 bottom
R32 "Res_0603" R0603 6627.12,4504.33 r180 bottom
R33 "Res_0603" R0603 6792.47,5819.29 r180 top
R34 "Res_0603" R0603 6792.47,5760.24 r180 top
R35 "Res_0603" R0603 6792.47,5878.35 r180 top
R36 "Res_0603" R0603 6792.47,5937.4 r180 top
R37 "Res_0603" R0603 6792.47,5996.46 r180 top
R38 "Res_0603" R0603 6792.47,6055.51 r180 top
R39 "Res_0603" R0603 6792.47,6114.57 r180 top
R40 "Res_0603" R0603 6792.47,6173.62 r180 top
R41 "Res_0603" R0603 6304.28,6880.45 r90 top
R42 "Res_0603" R0603 3595.62,5768.11 r90 top
R43 "Res_0603" R0603 5260.97,5716.93 r270 top
R44 "Res_0603" R0603 5631.05,6833.2 r90 top
R45 "Res_0603" R0603 5572,6833.2 r90 top
R46 "Res_0603" R0603 5512.94,6833.2 r90 top
R47 "Res_0603" R0603 5512.94,6832.94 r270 bottom
R48 "Res_0603" R0603 5453.89,6833.2 r270 bottom
R49 "Res_0603" R0603 5453.89,6833.2 r90 top
R50 "Res_0603" R0603 5276.72,6833.2 r90 top
R51 "Res_0603" R0603 5335.78,6833.2 r90 top
R52 "Res_0603" R0603 5217.67,6833.2 r90 top
R53 "Res_0603" R0603 5394.83,6833.2 r90 top
R54 "Res_0603" R0603 3877.25,5984.65 r180 top
R55 "Res_0603" R0603 3877.25,6043.7 r180 top
R56 "Res_0603" R0603 3877.25,6102.76 r180 top
R57 "Res_0603" R0603 6792.2,6291.73 r0 top
R58 "Res_0603" R0603 6792.47,6409.84 r0 top
R59 "Res_0603" R0603 6792.47,6350.79 r0 top
R60 "Res_0603" R0603 6792.47,6468.9 r0 top
R61 "Res_0603" R0603 5394.83,6833.06 r270 bottom
R62 "Res_0603" R0603 5217.66,6833.06 r270 bottom
R63 "Res_0603" R0603 6792.47,5642.13 r0 top
R64 "Res_0603" R0603 6792.47,5701.18 r0 top
R65 "Res_0603" R0603 6792.47,5524.02 r0 top
R66 "Res_0603" R0603 6792.73,5583.07 r0 top
R67 "Res_0603" R0603 6792.47,6232.68 r0 top
R68 "Res_0603" R0603 5749.16,6833.06 r90 top
R69 "Res_0603" R0603 5690.1,6833.06 r90 top
R70 "Res_0603" R0603 5335.77,6833.06 r90 bottom
RJ1 "DS1131-S80BP" RJ45-TH_DS1131-S80BP 4898.77,3650 r0 top locked
SW1 "TC-1102N-C-CL-B" SW-TH_TC-1102N-C-CL-B 3359.4,5661.81 r270 top
U1 "RTL8370N-VB-CG" LQFP-128_L20.0-W14.0-P0.50-BL-EP7.0 5327,6183.58 r0 top locked
U2 "BY25Q16BSTIG(R)" SOP-8_L5.0-W4.0-P1.27-LS6.0-BL 6512.94,6775.99 r270 top
V1 "35*35*10" 35*35*10 4615.3,5464.96 r0 top locked
X1 "X322525MOB4SI" OSC-SMD_4P-L3.2-W2.5-BL 5036.56,6780.91 r0 top

## Footprints (in the part's own frame and the unit in brackets; to place one, negate y for a bottom-side part, rotate by r counter-clockwise, add the part's x,y. Pads: shape width x height; smd on the part's side, far side on the other; paste and mask are expansions set on the pad)
35*35*10 [mm]
  round 3.4 hole 3.4 unplated: 1(-2.7,4.472) 2(37.7,30.528)
  silkscreen extent -7.2,-0.03 42.17,35
C0603 [mm]
  rect 0.8x0.9 smd paste+0 mask+0: 1(-0.7,0) 2(0.7,0)
  silkscreen extent -1.41,-0.71 1.39,0.72
C0805 [mm]
  rect 1.41x1.35 smd paste-100 mask+0: 1(-1,0) 2(1,0)
  silkscreen extent -1.96,-0.9 1.96,0.9
C1206 [mm]
  rect 1.485x1.728 smd paste-100 mask+0: 1(-1.593,0) 2(1.593,0)
  silkscreen extent -2.56,-1.09 2.56,1.09
CAP-SMD_BD6.3-L6.6-W6.6-FD [mm]
  rect 3.5x1.2 smd paste+0 mask+0: 1(-2.67,0) 2(2.67,0)
  silkscreen extent -3.38,-3.38 3.38,3.38
CAP-SMD_BD8.0-L8.3-W8.3-LS9.3-FD [mm]
  rect 4.6x1.6 smd paste+0 mask+0: 1(-3.724,0) 2(3.724,0)
  silkscreen extent -4.23,-4.23 4.18,4.23
CONN-SMD_P2.00_X2016WVS-02-9TSW [mm]
  rect 1x5.5 smd paste+0 mask+0: 1(1,1.125) 2(-1,1.125)
  rect 1.6x3 smd paste+0 mask+0: 3(-3.4,-1.125) 4(3.4,-1.125)
  silkscreen extent -4,-3.79 4,1.68
DC-IN-TH_DC-005-5A-2.5 [mil]
  oval 70.9x165.4 hole 39.4 slot 137.8 at 90 deg paste+0 mask+0: 1(118.1,92.6)
  oval 70.9x157.5 hole 39.4 slot 129.9 at 90 deg paste+0 mask+0: 2(-118.1,92.6)
  oval 157.5x70.9 hole 39.4 slot 129.9 at 0 deg paste+0 mask+0: 3(0,-92.6)
  silkscreen extent -434,-87 133,268
HDR-TH_4P-P2.54-V-F [mm]
  rect 1.7x1.7 hole 1.1 paste+0 mask+0: 1(-3.81,0)
  round 1.7 hole 1.1 paste+0 mask+0: 2(-1.27,0) 3(1.27,0) 4(3.81,0)
  silkscreen extent -5.29,-1.27 5.29,1.27
LED-TH_A694B2SYGS530-E2 [mm]
  rect 1.8x1.8 hole 1 paste+0 mask+0: 1(-1.27,-1.27)
  round 1.8 hole 1 paste+0 mask+0: 2(1.27,-1.27) 3(-1.27,1.27) 4(1.27,1.27)
  silkscreen extent -2.15,-8.85 2.15,2.65
LED_0603 [mil]
  rect 31.5x31.5 smd paste+0 mask+0: 1(-33.5,-0.4) 2(29.5,-0.2)
  silkscreen extent -61,-30 53,30
LQFP-128_L20.0-W14.0-P0.50-BL-EP7.0 [mm]
  oval 0.25x1.5 smd paste+0 mask+0: 1(-9.25,-8) 2(-8.75,-8) 3(-8.25,-8) 4(-7.75,-8) 5(-7.25,-8) 6(-6.75,-8) 7(-6.25,-8) 8(-5.75,-8) 9(-5.25,-8) 10(-4.75,-8) 11(-4.25,-8) 12(-3.75,-8) 13(-3.25,-8) 14(-2.75,-8) 15(-2.25,-8) 16(-1.75,-8) 17(-1.25,-8) 18(-0.75,-8) 19(-0.25,-8) 20(0.25,-8) 21(0.75,-8) 22(1.25,-8) 23(1.75,-8) 24(2.25,-8) 25(2.75,-8) 26(3.25,-8) 27(3.75,-8) 28(4.25,-8) 29(4.75,-8) 30(5.25,-8) 31(5.75,-8) 32(6.25,-8) 33(6.75,-8) 34(7.25,-8) 35(7.75,-8) 36(8.25,-8) 37(8.75,-8) 38(9.25,-8) 65(9.25,8) 66(8.75,8) 67(8.25,8) 68(7.75,8) 69(7.25,8) 70(6.75,8) 71(6.25,8) 72(5.75,8) 73(5.25,8) 74(4.75,8) 75(4.25,8) 76(3.75,8) 77(3.25,8) 78(2.75,8) 79(2.25,8) 80(1.75,8) 81(1.25,8) 82(0.75,8) 83(0.25,8) 84(-0.25,8) 85(-0.75,8) 86(-1.25,8) 87(-1.75,8) 88(-2.25,8) 89(-2.75,8) 90(-3.25,8) 91(-3.75,8) 92(-4.25,8) 93(-4.75,8) 94(-5.25,8) 95(-5.75,8) 96(-6.25,8) 97(-6.75,8) 98(-7.25,8) 99(-7.75,8) 100(-8.25,8) 101(-8.75,8) 102(-9.25,8)
  oval 1.5x0.25 smd paste+0 mask+0: 39(11,-6.25) 40(11,-5.75) 41(11,-5.25) 42(11,-4.75) 43(11,-4.25) 44(11,-3.75) 45(11,-3.25) 46(11,-2.75) 47(11,-2.25) 48(11,-1.75) 49(11,-1.25) 50(11,-0.75) 51(11,-0.25) 52(11,0.25) 53(11,0.75) 54(11,1.25) 55(11,1.75) 56(11,2.25) 57(11,2.75) 58(11,3.25) 59(11,3.75) 60(11,4.25) 61(11,4.75) 62(11,5.25) 63(11,5.75) 64(11,6.25) 103(-11,6.25) 104(-11,5.75) 105(-11,5.25) 106(-11,4.75) 107(-11,4.25) 108(-11,3.75) 109(-11,3.25) 110(-11,2.75) 111(-11,2.25) 112(-11,1.75) 113(-11,1.25) 114(-11,0.75) 115(-11,0.25) 116(-11,-0.25) 117(-11,-0.75) 118(-11,-1.25) 119(-11,-1.75) 120(-11,-2.25) 121(-11,-2.75) 122(-11,-3.25) 123(-11,-3.75) 124(-11,-4.25) 125(-11,-4.75) 126(-11,-5.25) 127(-11,-5.75) 128(-11,-6.25)
  rect 7x7 smd paste+0 mask+0: 129(0,0)
  silkscreen extent -10,-8.55 10,7
OSC-SMD_4P-L3.2-W2.5-BL [mm]
  rect 1.4x1.2 smd paste+0 mask+0: 1(-1.1,-0.875) 2(1.1,-0.875) 3(1.1,0.875) 4(-1.1,0.875)
  silkscreen extent -2.29,-1.9 2.03,1.65
R0603 [mil]
  rect 31.75x34.02 smd paste-3937.01 mask+0: 1(-29.66,0) 2(29.66,0)
  silkscreen extent -55,-26 55,26
RJ45-TH_DS1131-S80BP [mil]
  round 100 hole 66.9 paste+0 mask+0: 1(-1159.5,395) 2(-1130.3,145) 3(-1160.2,-395) 4(1160.2,235) 5(1130.3,15.3) 6(1160.2,-395)
  rect 60x60 hole 36 paste+0 mask+0: A1(-999.5,35) B1(-649.5,395) C1(-449.5,35) D1(-99.5,395) E1(100.5,35) F1(450.5,395) G1(650.5,35) H1(1000.5,395)
  round 60 hole 36 paste+0 mask+0: A2(-949.5,135) A3(-899.5,35) A4(-849.5,135) A5(-799.5,35) A6(-749.5,135) A7(-699.5,35) A8(-649.5,135) B2(-699.5,295) B3(-749.5,395) B4(-799.5,295) B5(-849.5,395) B6(-899.5,295) B7(-949.5,395) B8(-999.5,295) C2(-399.5,135) C3(-349.5,35) C4(-299.5,135) C5(-249.5,35) C6(-199.5,135) C7(-149.5,35) C8(-99.5,135) D2(-149.5,295) D3(-199.5,395) D4(-249.5,295) D5(-299.5,395) D6(-349.5,295) D7(-399.5,395) D8(-449.5,295) E2(150.5,135) E3(200.5,35) E4(250.5,135) E5(300.5,35) E6(350.5,135) E7(400.5,35) E8(450.5,135) F2(400.5,295) F3(350.5,395) F4(300.5,295) F5(250.5,395) F6(200.5,295) F7(150.5,395) F8(100.5,295) G2(700.5,135) G3(750.5,35) G4(800.5,135) G5(850.5,35) G6(900.5,135) G7(950.5,35) G8(1000.5,135) H2(950.5,295) H3(900.5,395) H4(850.5,295) H5(800.5,395) H6(750.5,295) H7(700.5,395) H8(650.5,295)
  Board Outline Layer circle w0.2: c-1049.5,-215 r64
  Board Outline Layer circle w0.2: c1050.5,-215 r64
  silkscreen extent -1159,-645 1160,465
SMA_L4.3-W2.6-LS5.2-RD [mm]
  rect 2x2 smd paste+0 mask+0: 1(-2.2,0) 2(2.2,0)
  silkscreen extent -2.6,-1.43 2.6,1.43
SMD-48_L27.8-W12.3-P1.02-LS15.3-BL [mil]
  oval 25.2x90.6 smd paste+0 mask+0: 1(-461.8,-287.4) 2(-421.7,-287.4) 3(-381.5,-287.4) 4(-341.3,-287.4) 5(-301.2,-287.4) 6(-261,-287.4) 7(-220.9,-287.4) 8(-180.7,-287.4) 9(-140.6,-287.4) 10(-100.4,-287.4) 11(-60.2,-287.4) 12(-20.1,-287.4) 13(20.1,-287.4) 14(60.2,-287.4) 15(100.4,-287.4) 16(140.6,-287.4) 17(180.7,-287.4) 18(220.9,-287.4) 19(261,-287.4) 20(301.2,-287.4) 21(341.3,-287.4) 22(381.5,-287.4) 23(421.7,-287.4) 24(461.8,-287.4) 25(461.8,287.4) 26(421.7,287.4) 27(381.5,287.4) 28(341.3,287.4) 29(301.2,287.4) 30(261,287.4) 31(220.9,287.4) 32(180.7,287.4) 33(140.6,287.4) 34(100.4,287.4) 35(60.2,287.4) 36(20.1,287.4) 37(-20.1,287.4) 38(-60.2,287.4) 39(-100.4,287.4) 40(-140.6,287.4) 41(-180.7,287.4) 42(-220.9,287.4) 43(-261,287.4) 44(-301.2,287.4) 45(-341.3,287.4) 46(-381.5,287.4) 47(-421.7,287.4) 48(-461.8,287.4)
  silkscreen extent -547,-287 547,242
SOP-8_L5.0-W4.0-P1.27-LS6.0-BL [mil]
  oval 22.6x80.14 smd paste+0 mask+0: 1(-75,-108.97) 2(-25,-108.97) 3(25,-108.97) 4(75,-108.97) 5(75,108.97) 6(25,108.97) 7(-25,108.97) 8(-75,108.97)
  silkscreen extent -110,-115 99,60
SOT-23-3_L2.9-W1.3-P1.90-LS2.4-BR [mm]
  rect 1.25x0.7 smd paste+0 mask+0: 1(1,-0.95) 2(1,0.95) 3(-1,0)
  silkscreen extent -0.73,-1.53 0.73,1.53
SW-TH_TC-1102N-C-CL-B [mm]
  round 1.8 hole 1.2 paste+0 mask+0: 1(-2.25,-1.25) 2(2.25,-1.25)
  round 2.2 hole 1.5 paste+0 mask+0: 3(3.5,1.25) 4(-3.5,1.25)
  silkscreen extent -3.7,-8.64 3.7,2.75

## Free pads (board coordinates)
  round 59.06 hole 39.37: 1(5327,6183.58)

## Via types
v1: diameter 23.62, hole 15.75, Top Layer to Bottom Layer, 457 vias
v2: diameter 31.5, hole 23.62, Top Layer to Bottom Layer, 28 vias
v3: diameter 19.68, hole 11.81, Top Layer to Bottom Layer, 15 vias

## Nets (pads, with @x,y where several pads share a name; then routed paths per layer and width w, separated by ;. In a path a pad name is that pad's centre, name@x,y a point inside that pad or via, vN(x,y) a via of type N, cw(c..) or ccw(c..) an arc to the next point about the centre after c; other vN are vias at no path point)
1.0V: C44.2 C45.2 C49.1 C62.2 C63.2 C64.2 C65.2 C66.2 C67.2 C68.2 C69.2 C70.2 C71.2 C72.2 C73.2 C74.2 C75.2 C76.2 C77.2 C78.2 C79.2 H1.4 R55.1 U1.10 U1.18 U1.20 U1.21 U1.22 U1.23 U1.29 U1.39 U1.44 U1.49 U1.59 U1.76 U1.78 U1.92 U1.95 U1.107 U1.117 U1.122 U1.128 | length 8591.2
  Top Layer w9.84: v3(4827.9,6047.64) 4835.89,6055.63 U1.122@4893.93,6055.63 4976.82,6055.63 4977.51,6056.32 ; v3(4827.9,6153.94) 4893.8,6153.94 U1.117@4893.93,6154.06 4974.66,6154.06 4977.51,6151.21 ; v3(4827.9,6350.79) 4828.02,6350.91 U1.107@4893.93,6350.91 4973.23,6350.91 ; v1(5099.56,6429.53) 5100.62,6430.59 U1.95@5100.62,6498.54 ; 5136.98,5949.21 5139.99,5946.2 U1.10@5139.99,5868.62 5139.99,5800.67 v3(5138.93,5799.61) ; v1(5158.61,6429.53) 5159.68,6430.59 U1.92@5159.68,6498.54 ; 5293.27,5949.21 5297.47,5945.01 U1.18@5297.47,5868.62 5297.47,5770.99 C62.2@5323.96,5744.49 ; C62.2@5331.84,5744.49 5347.59,5760.24 5347.59,5807.48 5344.83,5810.23 ; U1.20@5336.84,5868.62 5336.84,5818.23 5344.83,5810.23 ; 5356.44,5949.21 5356.53,5949.13 ; 5358.55,5744.49 5356.53,5746.51 ; C77.2@5390.89,5744.49 C77.2@5383.02,5752.36 ; 5396.1,5949.21 5395.9,5949 U1.23@5395.9,5868.62 5395.9,5820.36 5385.77,5810.23 5383.02,5810.23 ; 5406.64,6417.72 5435.27,6446.34 U1.78@5435.27,6498.54 ; U1.76@5474.64,6498.54 5474.64,6448.15 v1(5493.26,6429.53) ; 5511.67,5949.21 5514.01,5946.88 U1.29@5514.01,5868.62 5514.01,5800.67 v3(5512.94,5799.61) ; 5678.3,6036.85 5679.21,6035.94 U1.44@5760.07,6035.94 5827.79,6035.94 v3(5827.9,6035.83) ; 5678.3,6131.33 5681.34,6134.37 U1.49@5760.07,6134.37 5760.18,6134.25 v3(5827.9,6134.25) ; 5678.3,6332.7 5679.77,6331.22 U1.59@5760.07,6331.22 5760.18,6331.1 v3(5827.9,6331.1) ; 5344.83,5810.23 5356.53,5810.23 ; 5356.53,5746.51 5365.36,5755.35 ; 5356.53,5746.51 5356.53,5764.19 ; 5356.53,5764.19 5365.36,5755.35 ; 5356.53,5764.19 5356.53,5810.23 ; 5356.53,5810.23 U1.21@5356.53,5868.62 5356.53,5949.13 ; 5356.53,5810.23 5366.15,5810.23 5376.21,5810.23 ; 5356.53,5949.13 5376.21,5929.45 U1.22@5376.21,5868.62 5376.21,5810.23 ; 5365.36,5755.35 5366.15,5756.14 5376.21,5766.19 ; 5376.21,5766.19 5383.02,5766.19 ; 5376.21,5766.19 5376.21,5759.18 C77.2@5383.02,5752.36 ; 5376.21,5766.19 5376.21,5810.23 ; 5376.21,5810.23 5383.02,5810.23 ; C77.2@5383.02,5752.36 5383.02,5766.19 ; 5383.02,5766.19 5383.02,5810.23
  Top Layer w11.81: 5358.55,5744.49 5366.15,5752.09 5366.15,5756.14 5366.15,5810.23
  Top Layer w15.75: R55.1@3906.91,6043.7 3946.01,6043.7 3961.76,6059.45 3961.76,6181.5 4023.57,6243.31 C49.1@4023.57,6303.54 ; C65.2@4804.28,5842.92 4804.28,5878.35 4855.46,5929.53 4947.14,5929.53 4999.73,5982.11 ; 5653.77,5983.74 5707.98,5929.53 5780.66,5929.53 5796.41,5913.78 C68.2@5796.41,5838.98
  Top Layer w31.5: C62.2@5323.96,5744.49 5331.84,5744.49 5358.55,5744.49 C77.2@5390.89,5744.49
  Top Layer w47.24: C45.2@4154.67,6464.96 4150.74,6468.9 4150.74,6543.7 4178.29,6571.26 4757.04,6571.26 ; 5406.64,6417.72 5040.04,6417.72 ; 5678.3,6332.7 5678.3,6131.33 5678.3,6036.85 5678.3,6008.27 5653.77,5983.74 5619.24,5949.21 5511.67,5949.21 5396.1,5949.21 5356.44,5949.21 5293.27,5949.21 5136.98,5949.21 5032.63,5949.21 4999.73,5982.11 4977.51,6004.33 4977.51,6056.32 4977.51,6151.21 4977.51,6355.18 ; 4757.04,6571.26 4784.59,6543.7 v2(4788.53,6539.77) v2(4820.03,6539.77) v2(4820.03,6571.26) v2(4788.99,6571.26) 4757.04,6571.26 ; 4977.51,6355.18 v2(5008.55,6386.22) ; 4977.51,6355.18 v2(4977.51,6417.72) v2(5008.55,6417.72) ; v2(5008.55,6386.22) v2(5008.55,6417.72) ; v2(5008.55,6386.22) 5040.04,6417.72 ; v2(5008.55,6417.72) 5040.04,6417.72
  Top Layer w55.12: H1.4@4006.64,6504.33 4006.64,6320.48 C49.1@4023.57,6303.54 4115.3,6303.54 4154.67,6342.91 C44.2@4154.67,6382.28 C45.2@4154.67,6464.96 4154.67,6508.27 4190.11,6543.7 v2@4784.59,6543.7
  Bottom Layer w23.62: v1(5355.46,6429.53) v1(5379.08,6429.53) v1(5493.26,6429.53) ; C79.2@5402.7,5933.46 5339.71,5933.46 v1(5335.78,5937.4) v1(5375.15,5937.4) v1(5406.64,5937.4)
  Bottom Layer w47.24: v2(4820.03,6539.77) v2(4788.53,6539.77) 4788.99,6540.22 v2(4788.99,6571.26) v2(4820.03,6571.26) ; v2(4820.03,6539.77) v2(4820.03,6571.26) ; v2(4820.03,6539.77) 4855.46,6539.77 v2(4977.51,6417.72) 4977.51,6386.68 v2(4977.05,6386.22) v2(5008.55,6386.22) v2(5008.55,6417.72) 4855,6571.26 v2(4820.03,6571.26)